# Altium PCB PCB_Cyborg_greenC_LED_RGB.PcbDoc
Units mm, origin at the board's own origin, x right, y up, seen from the top; angles counter-clockwise.
Board outline 20 x 13.5 mm, 2 copper layers (Top Layer, Bottom Layer); 27 components, 26 nets, 74 pads, 25 vias.
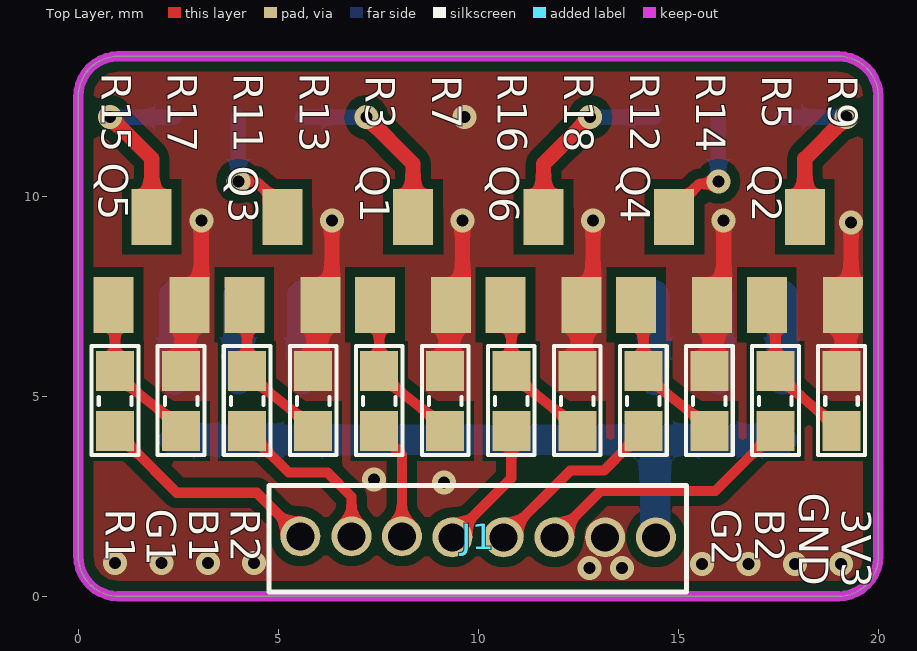
[diagram p0: Top Layer view]
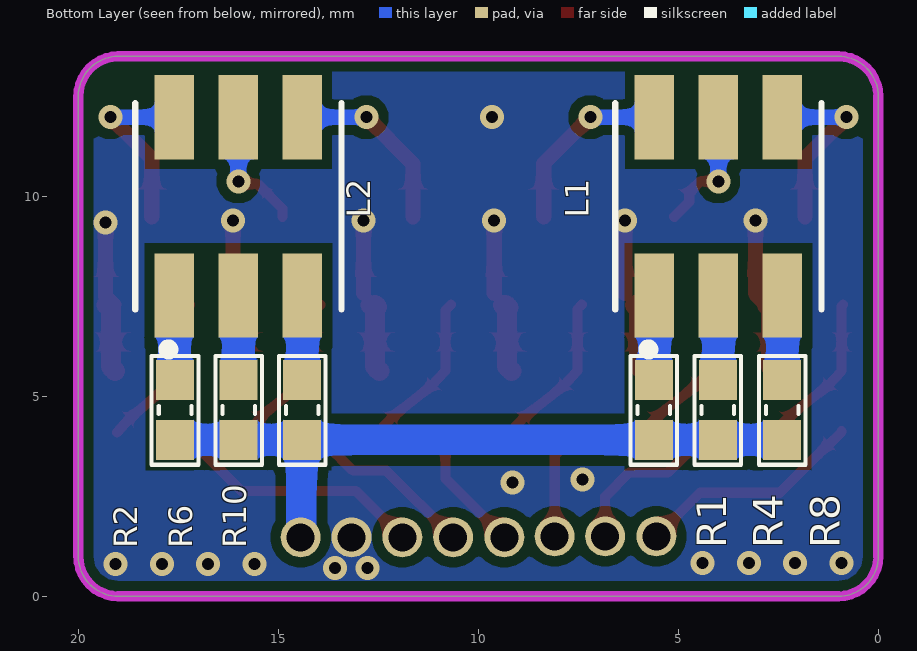
[diagram p1: Bottom Layer view, seen from below]
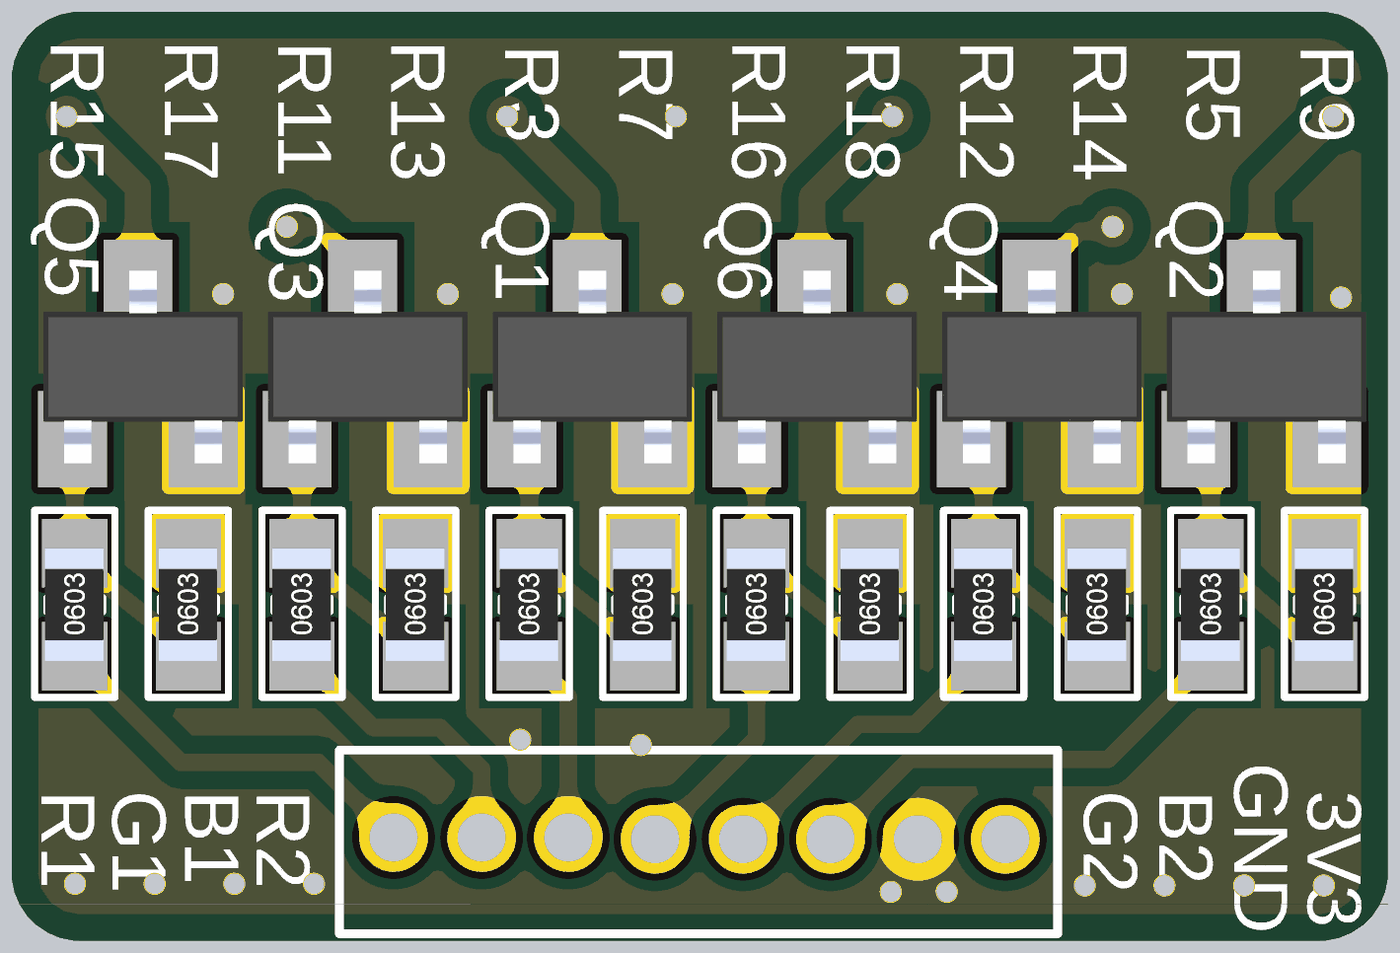
[diagram p2: 3D render of the assembled board from above, using the file's embedded part models]
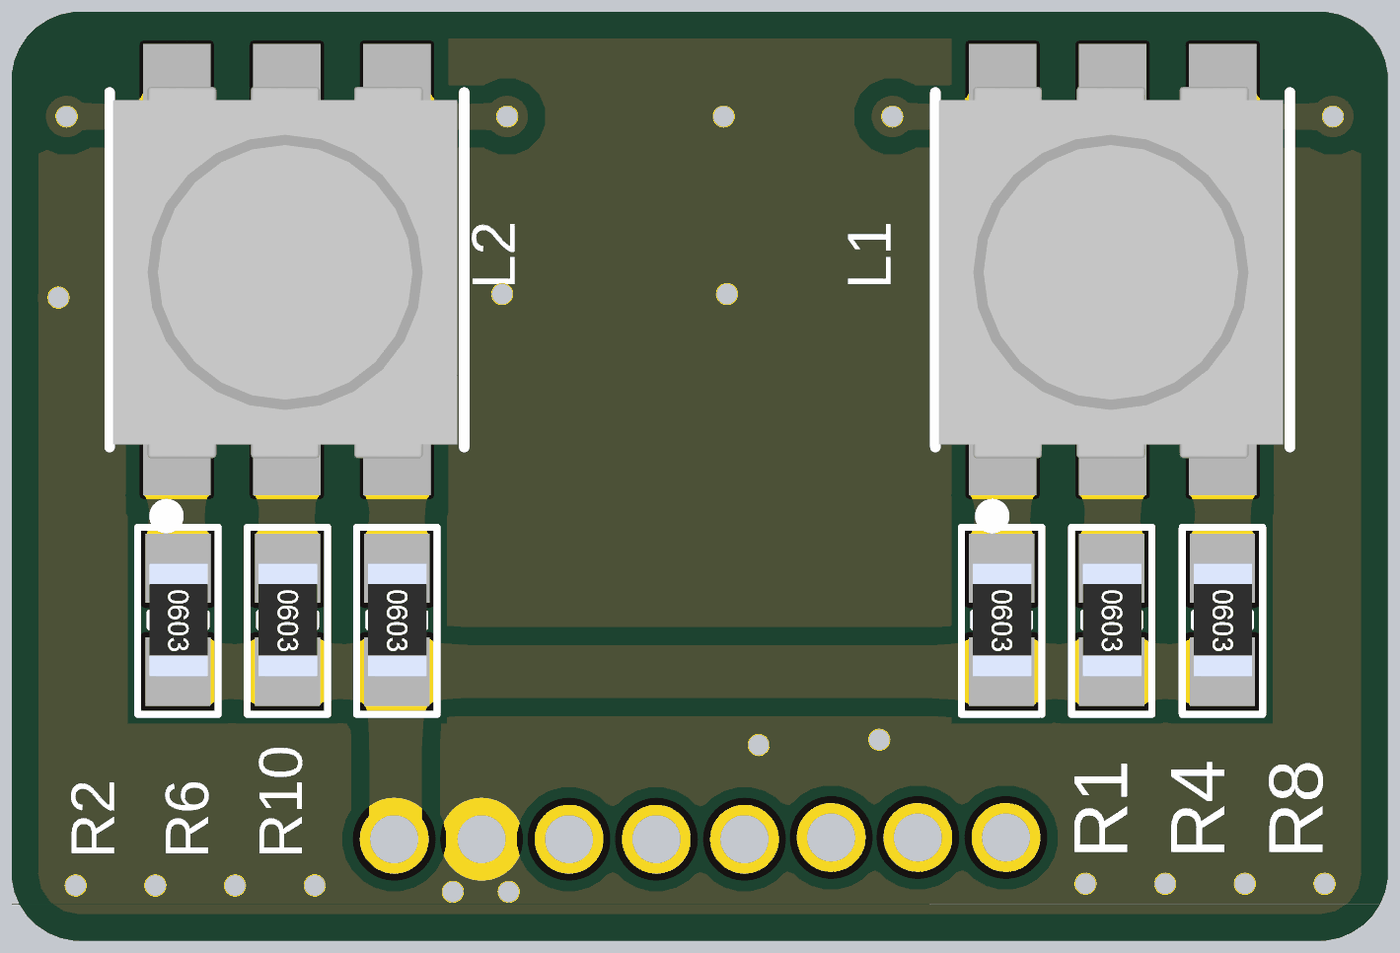
[diagram p3: 3D render of the assembled board from below, using the file's embedded part models]

## Layer stack, top to bottom
Top Solder: solder mask 0.0102, Solder Resist, Dk 3.5
Top Layer: signal copper 0.0356
Dielectric 1: dielectric 0.32, FR-4, Dk 4.8
Bottom Layer: signal copper 0.0356
Bottom Solder: solder mask 0.0102, Solder Resist, Dk 3.5

## Board outline
0,1 0,12.5 cw(c1,12.5) 1,13.5 19,13.5 cw(c19,12.5) 20,12.5 20,1 cw(c19,1) 19,0 1,0 cw(c1,1)

## Design rules (kind name [scope] priority, off if disabled: settings)
Clearance [All] p1: gap=0.254 ignorepadtopadclearanceinfootprint=TRUE
PolygonConnect [All] p1: connectstyle=Direct reliefconductorwidth=0.254 reliefentries=4 polygonreliefangle="90 Angle" airgapwidth=0.254
RoutingVias [All] p1: holewidth=0.4 width=0.8 viastyle="Through Hole" minholewidth=0.3 minwidth=0.6 maxholewidth=0.3 maxwidth=0.6
SilkToSilkClearance [All] p1 off: silktosilkclearance=0.254
SilkToSolderMaskClearance [IsPad] p1 off: minsilkscreentomaskgap=0.254 clearancetoexposedcopper=TRUE
SolderMaskExpansion [All] p1: expansion=0.102 istentingtop=FALSE
Width [All] p1: maxlimit=0.762 minlimit=0.254 preferedwidth=0.254
28 further rules are at their usual default settings.

## Components (designator, comment, footprint, x,y, rotation, side; value= is the part's Value field where it differs from the comment)
J1 "JP1x8" "JP1X8 1.27mm" 9.995,1.526 r180 top
L1 "RGB" "LED-ARRAY-SMD_6P-L5.0-W5.0-TL-RD_XL-5050RGBC-MS - duplicate" 4,9.538 r90 bottom
L2 "RGB" "LED-ARRAY-SMD_6P-L5.0-W5.0-TL-RD_XL-5050RGBC-MS - duplicate" 16,9.538 r90 bottom
Q1 "AO3400" SOT23 8.366,8.389 r0 top
Q2 "AO3400" SOT23 18.162,8.389 r0 top
Q3 "AO3400" SOT23 5.1,8.389 r0 top
Q4 "AO3400" SOT23 14.897,8.389 r0 top
Q5 "AO3400" SOT23 1.835,8.389 r0 top
Q6 "AO3400" SOT23 11.631,8.389 r0 top
R1 "68R" "tro smd 0603" 5.613,4.662 r270 bottom
R2 "68R" "tro smd 0603" 17.582,4.662 r270 bottom
R3 "100R" "tro smd 0603" 7.522,4.883 r90 top
R4 "15R" "tro smd 0603" 4.013,4.662 r270 bottom
R5 "100R" "tro smd 0603" 17.428,4.883 r90 top
R6 "15R" "tro smd 0603" 15.991,4.662 r270 bottom
R7 "10k" "tro smd 0603" 9.173,4.883 r90 top
R8 "15R" "tro smd 0603" 2.404,4.662 r270 bottom
R9 "10k" "tro smd 0603" 19.079,4.883 r90 top
R10 "15R" "tro smd 0603" 14.402,4.662 r270 bottom
R11 "100R" "tro smd 0603" 4.22,4.883 r90 top
R12 "100R" "tro smd 0603" 14.126,4.883 r90 top
R13 "10k" "tro smd 0603" 5.871,4.883 r90 top
R14 "10k" "tro smd 0603" 15.777,4.883 r90 top
R15 "100R" "tro smd 0603" 0.918,4.883 r90 top
R16 "100R" "tro smd 0603" 10.824,4.883 r90 top
R17 "10k" "tro smd 0603" 2.569,4.883 r90 top
R18 "10k" "tro smd 0603" 12.475,4.883 r90 top

## Footprints (in the part's own frame and the unit in brackets; to place one, negate y for a bottom-side part, rotate by r counter-clockwise, add the part's x,y. Pads: shape width x height; smd on the part's side, far side on the other; paste and mask are expansions set on the pad)
"JP1X8 1.27mm" [mm] "1.27MM"
  round 1 hole 0.7: 1(-4.445,0.051) 2(-3.175,0.051) 3(-1.905,0.051) 4(-0.635,0.051) 5(0.645,0.051) 6(1.905,0.026) 7(3.165,0.026) 8(4.445,0.026)
  silkscreen extent -5.21,-1.24 5.23,1.42
"LED-ARRAY-SMD_6P-L5.0-W5.0-TL-RD_XL-5050RGBC-MS - duplicate" [mm]
  rect 2.105x0.98 smd paste+0 mask+0.051: 1(-2.015,1.6) 2(-2.015,0) 3(-2.015,-1.6) 4(2.44,-1.6) 5(2.44,0) 6(2.44,1.6)
  silkscreen extent -3.49,-2.58 2.79,2.58, body extent -2.52,-2.47 2.88,2.53, height 1.5
SOT23 [mm]
  rect 1x1.4 smd paste+0 mask+0.102: 1(-0.95,-1.1) 2(0.95,-1.1) 3(0,1.1)
  body extent -1.38,-1.45 1.52,1.35, height 1.25
"tro smd 0603" [mm] "Chip Capacitor, 2-Leads, Body 1,60x0,80mm, IPC Medium Density"
  rect 1x0.95 smd mask+0.076: 1(-0.75,0) 2(0.75,0)
  silkscreen extent -1.35,-0.58 1.37,0.58, body extent -0.82,-0.42 0.82,0.43, height 0.44

## Part data
J1: "1.27mm"
L1 L2: "SMD"
Q1 Q2 Q3 Q4 Q5 Q6: library part "MOSFET N_Channel"
R1 R2 R3 R4 R5 R6 R7 R8 R9 R10 R11 R12 R13 R14 R15 R16 R17 R18: library part "Tro 0603 1% 0R", "Dán", Chung_Loai=Dán, Don_Vi=Con, Ma_Hang=MH005792, So_Chan=2, Ten_Linh_Kien="Trở 0603 1% 0R"

## Via types
v1: diameter 0.6, hole 0.3, Top Layer to Bottom Layer, tented both sides, 25 vias

## Nets (pads, with @x,y where several pads share a name; then routed paths per layer and width w, separated by ;. In a path a pad name is that pad's centre, name@x,y a point inside that pad or via, vN(x,y) a via of type N, cw(c..) or ccw(c..) an arc to the next point about the centre after c; other vN are vias at no path point)
3V3: J1.1 R1.2 R2.2 R4.2 R6.2 R8.2 R10.2 | length 17.7
  Bottom Layer w0.762: R8.2 R4.2 R1.2 ; R1.2@5.582,3.88 R1.2 ; J1.1 14.421,1.494 14.421,3.892 R10.2 ; R2.2 R6.2 R10.2 ; R1.2 R10.2
B1: J1.6 R3.1 | length 2.9
  Top Layer w0.254: R3.1 7.522,4.108 8.09,3.54 J1.6
B2: J1.3 R5.1 | length 6.6
  Top Layer w0.254: J1.3 13.06,2.635 15.93,2.635 17.055,3.76 17.08,3.76 17.428,4.108 R5.1
G1: J1.7 R11.1 | length 4.3
  Top Layer w0.254: R11.1 4.22,4.108 4.568,3.76 4.593,3.76 5.255,3.099 6.223,3.099 6.83,2.492 J1.7
G2: J1.4 R12.1 | length 4.6
  Top Layer w0.254: J1.4 12.298,3.143 13.136,3.143 13.753,3.76 13.778,3.76 14.126,4.108 R12.1
GB1: L1.6 Q1.3 | length 4.6
  Top Layer w0.381: v1(7.202,11.978) 8.366,10.814 Q1.3
  Bottom Layer w0.381: L1.6 v1(7.202,11.978)
GB2: L2.6 Q2.3 | length 4.5
  Top Layer w0.381: Q2.3 18.162,10.939 v1(19.202,11.978)
  Bottom Layer w0.381: L2.6 v1(19.202,11.978)
GG1: L1.5 Q3.3 | length 3.2
  Top Layer w0.254: v1(4,10.376) 4.002,10.374 4.453,10.374 4.727,10.099 4.727,9.862 Q3.3
  Bottom Layer w0.381: v1(4,10.376) L1.5
GG2: L2.5 Q4.3 | length 3.2
  Top Layer w0.254: Q4.3 14.897,9.689 15.518,10.31 15.934,10.31 v1(16,10.376)
  Bottom Layer w0.381: v1(16,10.376) L2.5
GND: J1.2 Q1.2 Q2.2 Q3.2 Q4.2 Q5.2 Q6.2 R7.2 R9.2 R13.2 R14.2 R17.2 R18.2 | length 22.8
  Top Layer w0.381: Q5.2 3.073,7.577 v1(3.073,9.398) ; Q3.2@6.339,7.577 v1(6.339,9.398) ; Q1.2@9.604,7.577 v1(9.604,9.398) ; Q6.2@12.87,7.577 v1(12.87,9.398) ; Q4.2@16.136,7.577 v1(16.136,9.398) ; Q2.2 19.319,7.495 v1(19.319,9.347)
  Top Layer w0.5: R17.2 2.677,5.741 2.677,7.181 Q5.2 ; R13.2@5.961,5.723 R13.2 5.979,5.741 5.979,7.181 Q3.2@6.087,7.289 ; Q3.2@5.961,7.199 Q3.2 ; R7.2@9.244,5.705 R7.2 9.281,5.741 9.281,7.181 Q1.2@9.389,7.289 ; Q1.2@9.244,7.217 Q1.2 ; R18.2@12.528,5.687 R18.2 12.583,5.741 12.583,7.181 Q6.2@12.691,7.289 ; Q6.2@12.528,7.236 Q6.2 ; R14.2@15.812,5.668 R14.2 15.885,5.741 15.885,7.181 Q4.2@15.993,7.289 ; Q4.2@15.812,7.254 Q4.2 ; R9.2 19.187,5.741 19.187,7.181 Q2.2@19.295,7.289
  other v1: 12.776,0.711 13.589,0.711 15.596,0.803 16.754,0.803 17.912,0.803 19.07,0.803 0.92,0.828 2.078,0.828 3.236,0.828 4.394,0.828 9.144,2.845 7.391,2.921 9.652,11.978
GR1: L1.4 Q5.3 | length 4.5
  Top Layer w0.381: v1(0.798,11.978) 1.835,10.941 Q5.3
  Bottom Layer w0.381: v1(0.798,11.978) L1.4
GR2: L2.4 Q6.3 | length 4.6
  Top Layer w0.381: Q6.3 11.631,10.812 v1(12.798,11.978)
  Bottom Layer w0.381: v1(12.798,11.978) L2.4
NetL1_1: L1.1 R1.1 | length 2.1
  Bottom Layer w0.254: R1.1@5.6,5.425 R1.1
  Bottom Layer w0.762: R1.1@5.6,5.425 L1.1
NetL1_2: L1.2 R4.1 | length 2.1
  Bottom Layer w0.254: R4.1@4,5.425 R4.1
  Bottom Layer w0.762: R4.1@4,5.425 L1.2
NetL1_3: L1.3 R8.1 | length 2.1
  Bottom Layer w0.254: R8.1@2.4,5.416 R8.1
  Bottom Layer w0.762: R8.1@2.4,5.416 L1.3
NetL2_1: L2.1 R2.1 | length 2.1
  Bottom Layer w0.3: R2.1 R2.1@17.6,5.429
  Bottom Layer w0.762: R2.1@17.6,5.429 L2.1
NetL2_2: L2.2 R6.1 | length 2.1
  Bottom Layer w0.254: R6.1 R6.1@16,5.421
  Bottom Layer w0.762: R6.1@16,5.421 L2.2
NetL2_3: L2.3 R10.1 | length 2.1
  Bottom Layer w0.254: R10.1@14.4,5.413 R10.1
  Bottom Layer w0.762: R10.1@14.4,5.413 L2.3
NetQ1_1: Q1.1 R3.2 R7.1 | length 3.9
  Top Layer w0.254: Q1.1 7.522,7.183 R3.2 7.87,5.26 8.825,4.506 R7.1
NetQ2_1: Q2.1 R5.2 R9.1 | length 4
  Top Layer w0.254: Q2.1 17.428,7.073 R5.2 17.776,5.26 17.85,5.188 18.731,4.437 R9.1@19.031,4.098
NetQ3_1: Q3.1 R11.2 R13.1 | length 4
  Top Layer w0.254: Q3.1 4.22,7.219 R11.2 4.568,5.26 5.523,4.506 R13.1 ; R13.1@5.871,4.032 R13.1@5.896,4.057
NetQ4_1: Q4.1 R12.2 R14.1 | length 4.1
  Top Layer w0.254: Q4.1 14.126,7.109 R12.2 14.474,5.26 15.429,4.506 15.729,4.098 15.777,4.032 R14.1@15.803,4.057
NetQ5_1: Q5.1 R15.2 R17.1 | length 3.9
  Top Layer w0.254: Q5.1 0.918,7.256 R15.2 1.266,5.26 2.221,4.506 R17.1
NetQ6_1: Q6.1 R16.2 R18.1 | length 4
  Top Layer w0.254: Q6.1 10.824,7.146 R16.2 11.172,5.26 12.127,4.506 R18.1
R1: J1.8 R15.1 | length 5.7
  Top Layer w0.254: R15.1 0.918,4.108 1.266,3.76 1.291,3.76 2.46,2.591 4.459,2.591 J1.8
R2: J1.5 R16.1 | length 3.3
  Top Layer w0.254: J1.5 10.824,2.949 10.824,4.108 R16.1

## Polygon pours and split planes (outlines as drawn)
GND on Top Layer "GND_L01_P002" (solid, remove dead copper, pour order 2): 0,0 0,13.5 20,13.5 20,0
GND on Top Layer "GND_TOP" (solid, pour order 0): 0,0 20,0 20,13.5 0,13.5
GND on Bottom Layer "GND_BOT" (solid, remove dead copper, pour order 1): 0,0 20,0 20,13.5 0,13.5

## Keep-outs
Keep-Out Layer:
  the board outline again, w0.254

## Silkscreen, mask and mechanical layers (free items; w line width, h text height)
Top Overlay:
  text "GND" at 17.769,2.591 h1.27 r270
  text "R1" at 0.432,2.184 h1.27 r270
  text "G1" at 1.465,2.184 h1.27 r270
  text "B1" at 2.523,2.184 h1.27 r270
  text "R2" at 3.556,2.184 h1.27 r270
  text "G2" at 15.584,2.184 h1.27 r270
  text "B2" at 16.676,2.184 h1.27 r270
  text "3V3" at 18.835,2.184 h1.27 r270